# Altium PCB DB36.PcbDoc (part 5 of 6)
Units mm, origin at the board's own origin, x right, y up, seen from the top; angles counter-clockwise.
Board outline 82.2 x 113.2 mm, 8 copper layers (Top Layer, MidLayer1, MidLayer2, GND, MidLayer3, VCC, MidLayer4, Bottom Layer), stack 1.57 mm thick; 185 components, 477 nets, 1727 pads, 1538 vias.
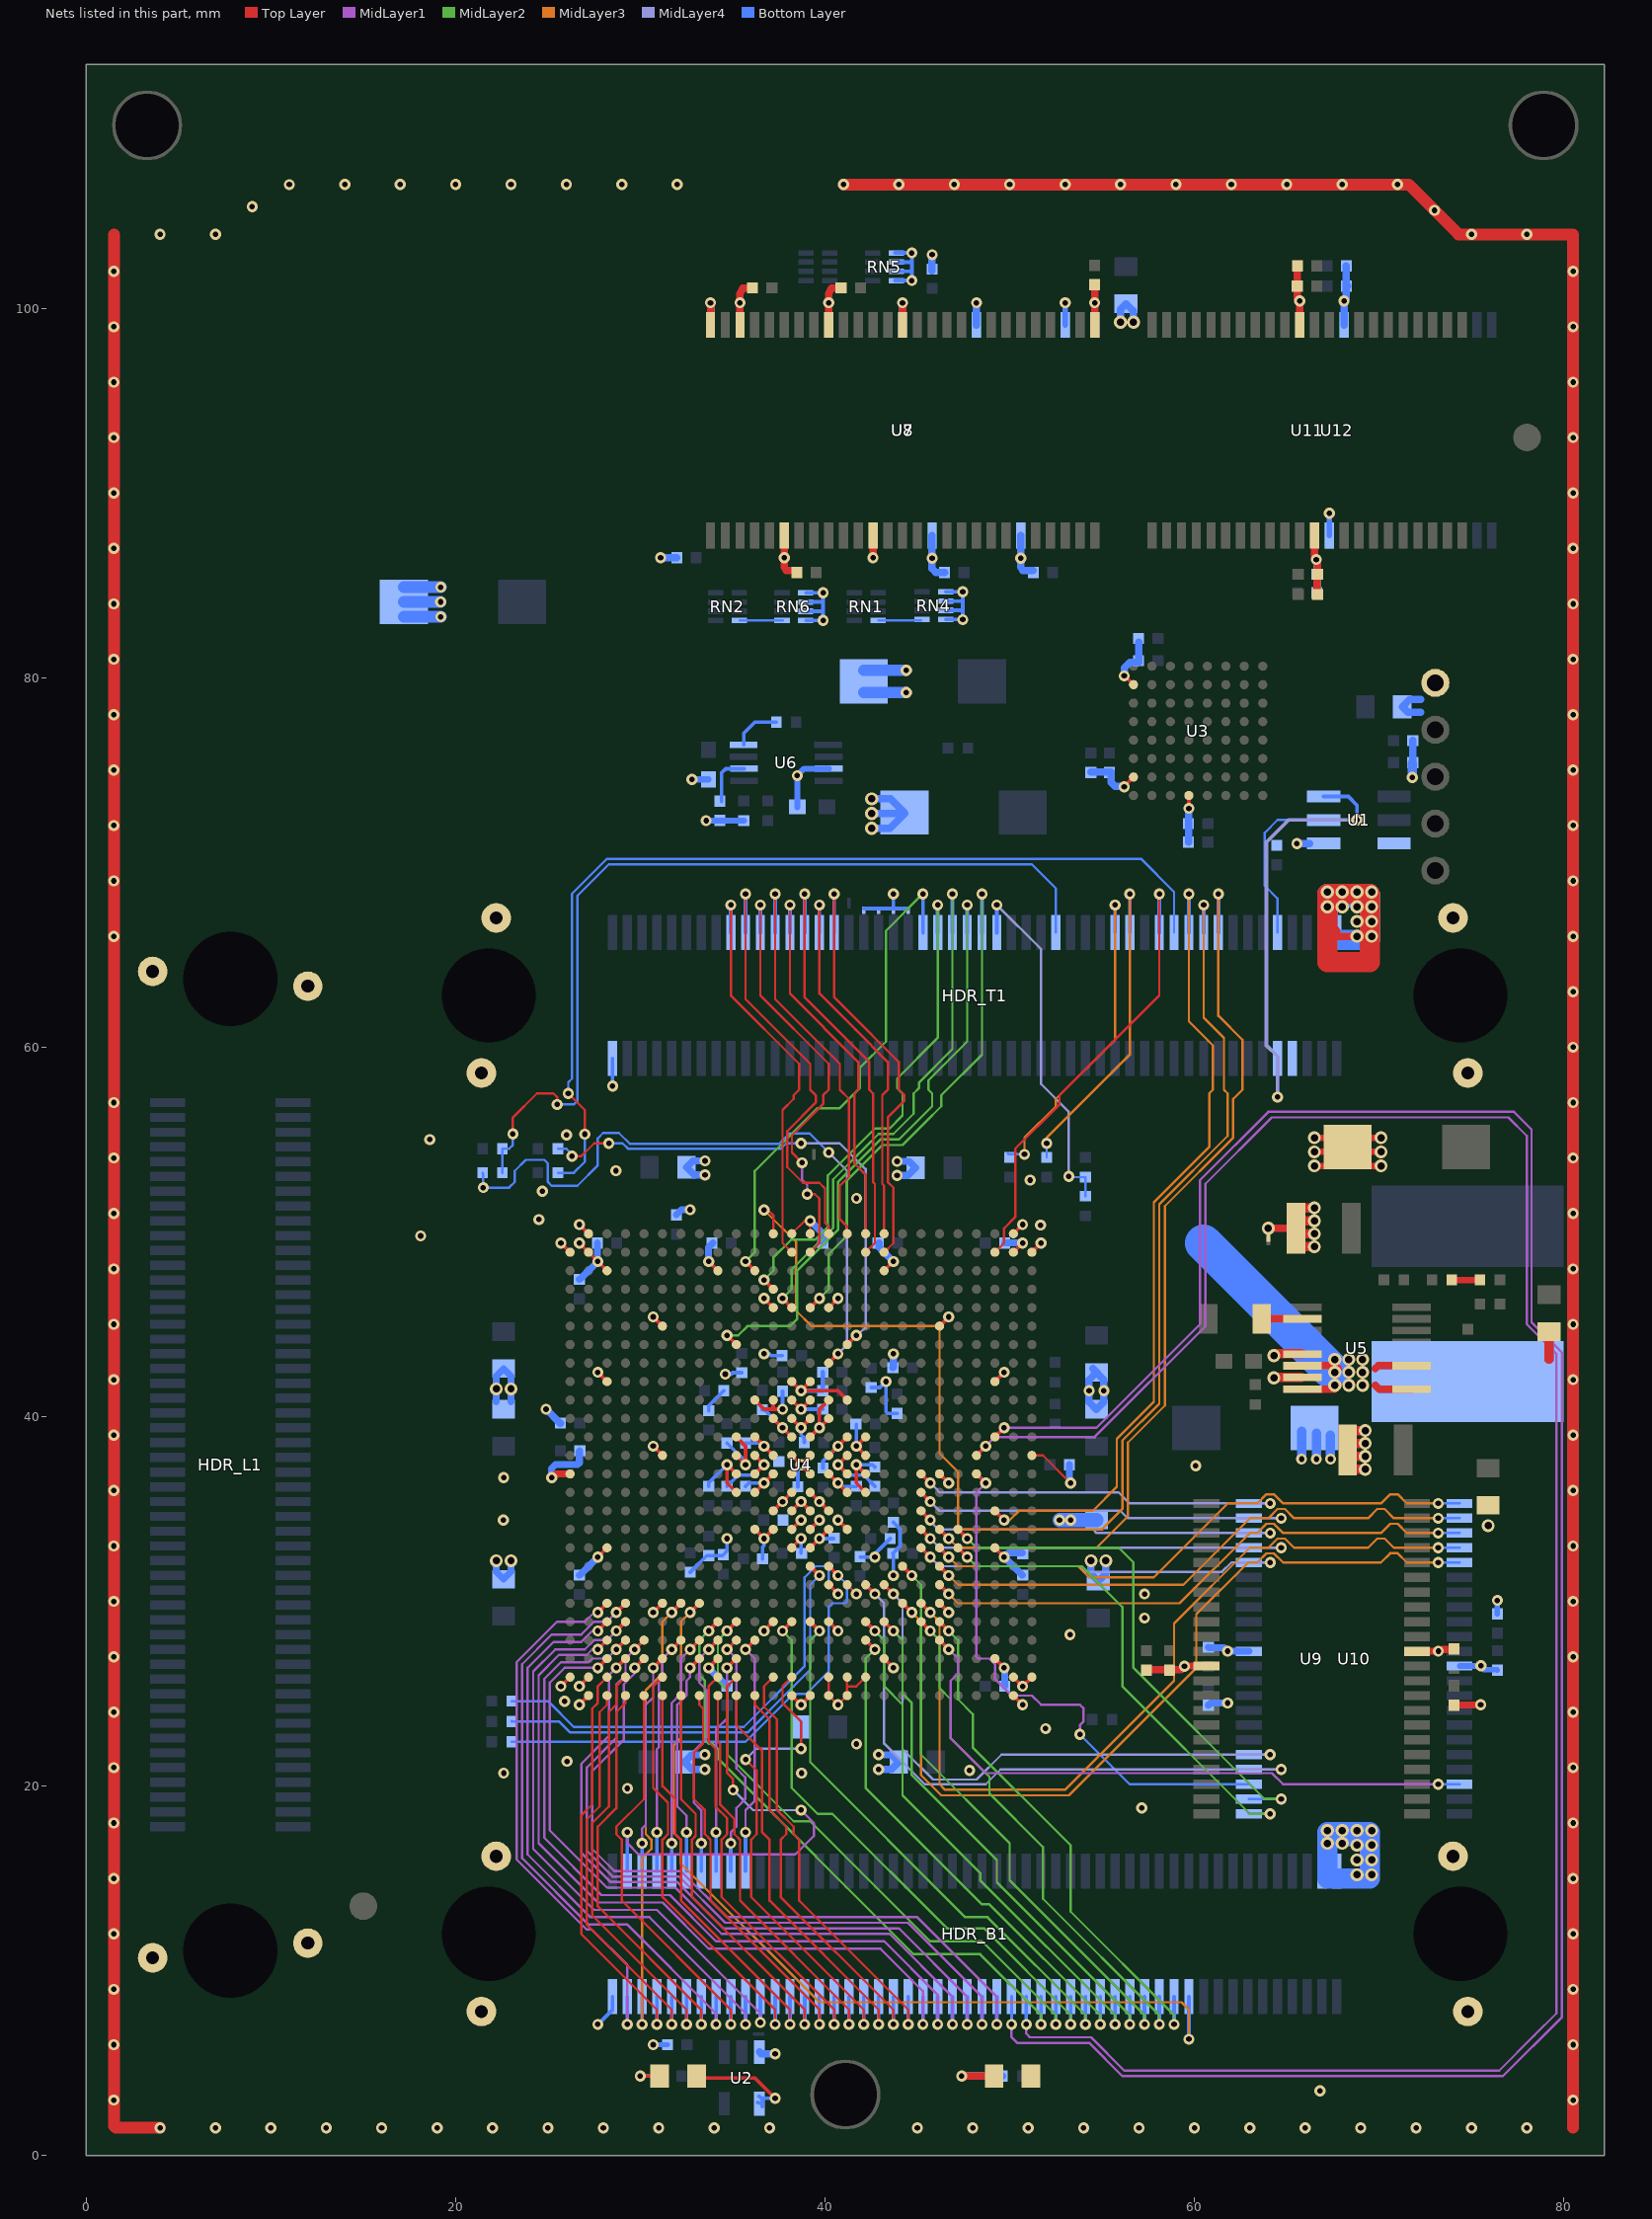
[diagram p11: the nets of this part, all layers, seen from the top]

## Via types
v1: diameter 0.6, hole 0.3, Top Layer to Bottom Layer, 904 vias
v2: diameter 0.6, hole 0.3, Top Layer to Bottom Layer, tented both sides, 506 vias
v3: diameter 0.7, hole 0.4, Top Layer to Bottom Layer, 127 vias
v4: diameter 0.6, hole 0.3, Top Layer to Bottom Layer, tented top, 1 vias

## Nets (pads, with @x,y where several pads share a name; then routed paths per layer and width w, separated by ;. In a path a pad name is that pad's centre, name@x,y a point inside that pad or via, vN(x,y) a via of type N, cw(c..) or ccw(c..) an arc to the next point about the centre after c; other vN are vias at no path point) (continued)
FPGA_PROGRAM: HDR_T1.62 R3.1 R15.1 | length 48.7
  Top Layer w0.127: v1(23.1,55.3) 23.1,56.2 24.4,57.5 25.3,57.5 25.5,57.3 v1(25.5,56.9)
  Bottom Layer w0.127: R15.1@22.538,53.2 R3.1@22.538,54.5 22.9,54.5 23.1,54.7 v1(23.1,55.3) ; v1(25.5,56.9) 26.4,56.9 26.6,57.1 26.6,68.2 28.3,69.9 51.2,69.9 52.5,68.6 HDR_T1.62@52.5,66.2
FPGA_TCK: HDR_T1.72 R7.1 | length 18.2
  MidLayer3 w0.127: v1(52,54.8) 52,55.1 52.3,55.4 ; 52.3,55.4 56.5,59.6 v2(56.5,68.3)
  Bottom Layer w0.127: R7.1@52,54.038 v1(52,54.8)
  Bottom Layer w0.2: HDR_T1.72@56.5,66.2 v2(56.5,68.3)
FPGA_TDI: HDR_T1.78 R10.1 | length 53
  Top Layer w0.127: v1(26.1,57.5) 27,56.6 v1(27,55.293)
  Bottom Layer w0.127: R10.1@25.538,53.2 26.4,53.2 27,53.8 v1(27,55.293) ; v1(26.1,57.5) 26.1,58.1 26.3,58.3 26.3,68.3 28.2,70.2 57.1,70.2 58.9,68.4 HDR_T1.78@58.9,66.2
FPGA_TDO: HDR_T1.54 R5.1 R8.1 | length 19.8
  MidLayer4 w0.127: v2(49.3,67.7) 51.7,65.3 51.7,58 53.2,56.5 v1(53.2,53)
  Bottom Layer w0.127: v1(53.2,53) 53.238,52.962 R5.1@54.1,52.962 R8.1@54.1,51.938
  Bottom Layer w0.2: HDR_T1.54@49.3,66.2 v2(49.3,67.7)
FPGA_TMS: HDR_T1.70 R6.1 | length 17.9
  MidLayer3 w0.127: v1(50.8,54.2) 50.8,55.1 52.5,56.8 52.5,57.2 55.7,60.4 v2(55.7,67.7)
  Bottom Layer w0.127: R6.1@49.9,54.238 49.938,54.2 50,54.2 v1(50.8,54.2)
  Bottom Layer w0.2: HDR_T1.70@55.7,66.2 v2(55.7,67.7)
GND: C1.1 C2.2 C3.2 C4.2 C5.2 C6.2 C7.2 C8.2 C9.2 C10.2 C11.2 C12.2 C13.2 C14.2 C15.2 C16.2 C17.2 C18.2 C19.2 C20.2 C21.2 C22.2 C23.2 C24.2 C25.2 C26.2 C27.2 C28.2 C29.2 C30.2 C31.2 C32.2 C33.2 C34.2 C35.2 C36.2 C37.2 C38.2 C39.2 C40.2 C41.2 C42.2 C43.2 C44.2 C45.2 C46.2 C47.2 C48.2 C49.2 C50.2 C51.2 C52.2 C53.2 C54.2 C55.2 C56.2 C57.2 C58.2 C59.2 C60.2 C61.2 C62.2 C63.2 C64.2 C65.2 C66.2 C67.2 C68.2 C69.2 C70.2 C71.1 C72.2 C73.2 C74.2 C75.2 C76.2 C77.2 C78.2 C79.2 C82.2 C83.2 C84.2 C85.2 C86.2 C88.2 C89.2 C90.2 C91.2 C92.2 C93.2 C94.2 C95.2 C96.2 C97.2 C98.2 C99.2 C100.2 C101.2 C102.2 C103.2 C104.2 C105.2 C106.2 C107.2 C108.2 C109.2 C110.2 C111.2 C112.2 C113.2 C114.2 HDR_B1.1 HDR_B1.98 HDR_B1.100 HDR_B1.MH1 HDR_B1.MH2 HDR_B1.MH3 HDR_B1.MH4 HDR_L1.MH1 HDR_L1.MH2 HDR_L1.MH3 HDR_L1.MH4 HDR_T1.1 HDR_T1.98 HDR_T1.100 HDR_T1.MH1 HDR_T1.MH2 HDR_T1.MH3 HDR_T1.MH4 LED2.2 NT3.2 NT5.2 NT6.2 NT7.2 NT8.2 R29.2 RN4.1 RN4.2 RN4.3 RN4.4 RN5.1 RN5.2 RN5.3 RN5.4 RN6.1 RN6.2 RN6.3 RN6.4 TP1.1 U1.1 U2.3 U3.E8 U3.H2 U3.H7 U4.A2 U4.A13 U4.A14 U4.A25 U4.AA6 U4.AA21 U4.AB12 U4.AB15 U4.AD9 U4.AD18 U4.AD24 U4.AE1 U4.AE2 U4.AE15 U4.AE16 U4.AE17 U4.AE25 U4.AE26 U4.AF2 U4.AF13 U4.AF14 U4.AF15 U4.AF16 U4.AF25 U4.B1 U4.B2 U4.B25 U4.B26 U4.C3 U4.C9 U4.C18 U4.E12 U4.E15 U4.F6 U4.F21 U4.J3 U4.J13 U4.J14 U4.J24 U4.K11 U4.K12 U4.K13 U4.K14 U4.K15 U4.K16 U4.L12 U4.L13 U4.L14 U4.L15 U4.M10 U4.M11 U4.M13 U4.M14 U4.M16 U4.M17 U4.N6 U4.N10 U4.N11 U4.N12 U4.N13 U4.N14 U4.N15 U4.N16 U4.N17 U4.N26 U4.P1 U4.P10 U4.P11 U4.P12 U4.P13 U4.P14 U4.P15 U4.P16 U4.P17 U4.P21 U4.R10 U4.R11 U4.R13 U4.R14 U4.R16 U4.R17 U4.T12 U4.T13 U4.T14 U4.T15 U4.U11 U4.U12 U4.U13 U4.U14 U4.U15 U4.U16 U4.V3 U4.V13 U4.V14 U4.V24 U4.Y16 U5.13 U5.15 U6.3 U7.6 U7.12 U7.28 U7.41 U7.46 U7.52 U7.54 U8.6 U8.12 U8.28 U8.41 U8.46 U8.52 U8.54 U9.12 U9.34 U10.12 U10.34 U11.12 U11.34 U12.12 U12.34 | length 594.7
  Top Layer w0.127: U4.A13@38.2,49.9 38.9,50.6 v1(39.2,50.6) U4.A14@39.2,49.9 ; U4.AE15@40.2,25.9 U4.AF15@40.2,24.9 v1(40.7,24.4) U4.AF16@41.2,24.9 ; U4.AF16@41.1,24.8 U4.AF16@41.2,24.9 ; 41.2,25.4 41.7,25.4 U4.AE17@42.2,25.9 ; U4.AE16@41.2,25.9 U4.AF16@41.2,24.9 ; U4.Y16@41.2,30.9 v2(41.7,30.4) ; U4.N26@51.2,37.9 51.8,37.9 v1(53.3,36.4)
  Top Layer w0.2: v1(25.7,25.4) U4.AE1@26.2,25.9 ; v1(25.7,49.4) U4.B1@26.2,48.9 ; v1(26.7,24.4) U4.AF2@27.2,24.9 ; v1(26.7,25.4) U4.AE2@27.2,25.9 ; v1(26.7,49.4) U4.C3@28.2,47.9 ; v1(26.7,50.4) U4.A2@27.2,49.9 ; v1(27.7,32.4) U4.V3@28.2,32.9 ; v1(27.7,42.4) U4.J3@28.2,41.9 ; v1(30.7,29.4) U4.AA6@31.2,29.9 ; v1(30.7,38.4) U4.N6@31.2,37.9 ; v1(30.7,45.4) U4.F6@31.2,44.9 ; v1(33.7,26.4) U4.AD9@34.2,26.9 ; v1(33.7,48.4) U4.C9@34.2,47.9 ; U4.R10@35.2,35.9 34.7,36.4 v1(34.7,37.4) U4.P10@35.2,36.9 ; U4.N10@35.2,37.9 v1(35.7,37.4) 35.7,38.4 U4.M10@35.2,38.9 ; U4.U11@36.2,33.9 v2(36.7,33.4) U4.U12@37.2,33.9 ; U4.R11@36.2,35.9 v1(36.7,36.4) U4.P12@37.2,36.9 ; U4.P11@36.2,36.9 v1(36.7,37.4) U4.N11@36.2,37.9 ; U4.M11@36.2,38.9 U4.N12@37.2,37.9 ; U4.K11@36.2,40.9 36.7,40.4 v2(37.7,40.4) ; v1(36.7,28.4) U4.AB12@37.2,28.9 ; v1(36.7,46.4) U4.E12@37.2,45.9 ; U4.T12@37.2,35 U4.T12@37.2,34.9 v1(37.7,35.4) U4.R13@38.2,35.9 ; U4.L12@37.2,39.9 U4.M13@38.2,38.9 ; 37.2,40.4 U4.K12@37.2,40.9 ; U4.AF13@38.2,24.9 v1(38.7,24.4) U4.AF14@39.2,24.9 ; U4.V13@38.2,32.9 v1(38.7,33.4) ; U4.U13@38.2,33.9 v1(38.7,34.4) ; U4.T13@38.2,34.9 v1(38.7,35.4) U4.T14@39.2,34.9 ; U4.L13@38.2,39.9 v1(38.7,39.4) U4.L14@39.2,39.9 ; U4.K13@38.2,40.9 v1(38.7,40.4) U4.K14@39.2,40.9 ; U4.J13@38.2,41.9 v1(38.7,41.4) ; U4.V14@39.2,32.9 v2(39.7,33.4) U4.U15@40.2,33.9 ; U4.U14@39.2,33.9 v2(39.7,34.4) ; U4.R14@39.2,35.9 v1(39.7,35.4) U4.T15@40.2,34.9 ; U4.M14@39.2,38.9 U4.L15@40.2,39.9 ; U4.J14@39.2,41.9 v1(38.7,41.4) ; v1(39.7,39.4) 39.7,40.4 U4.K15@40.2,40.9 ; U4.AB15@40.2,28.9 v1(40.7,28.4) ; U4.P15@40.2,36.9 v1(40.7,36.4) U4.R16@41.2,35.9 ; U4.N15@40.2,37.9 U4.M16@41.2,38.9 ; U4.E15@40.2,45.9 v1(40.7,46.4) ; v2(40.7,34.4) U4.U16@41.2,33.9 ; U4.P16@41.2,36.9 v1(40.7,37.4) U4.N16@41.2,37.9 ; U4.K16@41.2,40.9 40.7,41.4 v1(38.7,41.4) ; U4.R17@42.2,35.9 41.7,36.4 v1(41.7,37.4) U4.P17@42.2,36.9 ; U4.N17@42.2,37.9 v1(41.7,38.4) U4.M17@42.2,38.9 ; U4.AD18@43.2,26.9 v1(43.7,26.4) ; U4.C18@43.2,47.9 v1(43.7,48.4) ; U4.AA21@46.2,29.9 v1(46.7,29.4) ; U4.P21@46.2,36.9 v1(46.7,36.4) ; U4.F21@46.2,44.9 v1(46.7,45.4) ; U4.AD24@49.2,26.9 v1(49.7,26.4) ; U4.V24@49.2,32.9 v1(49.7,32.4) ; U4.J24@49.2,41.9 v1(49.7,42.4) ; U4.AF25@50.2,24.9 v1(50.7,24.4) ; U4.AE25@50.2,25.9 v1(50.7,25.4) U4.AE26@51.2,25.9 ; U4.B25@50.2,48.9 v1(50.7,49.4) ; U4.A25@50.2,49.9 v1(50.7,50.4) ; U4.B26@51.2,48.9 v1(51.7,49.4) ; v1@56.2,74.125 U3.H7@56.7,74.625 ; v1@56.2,80.125 56.213,80.113 U3.H2@56.7,79.625 ; v1(59.7,72.925) U3.E8@59.7,73.625
  Top Layer w0.203: U4.P13@38.2,36.9 U4.N14@39.2,37.9 ; U4.N13@38.2,37.9 U4.P14@39.2,36.9
  Top Layer w0.35: v3(66.5,53.576) C82.2@67.795,53.576 ; v3(66.5,54.338) C82.2@67.795,54.338 ; v3(66.5,55.1) C82.2@67.795,55.1 ; C82.2@68.809,53.576 v3(70.104,53.576) ; C82.2@68.809,54.338 v3(70.104,54.338) ; C82.2@68.809,55.1 v3(70.104,55.1)
  Top Layer w0.381: v1(25.2,36.7) 25.4,36.9 U4.P1@26.2,36.9 ; C102.2@57.4,26.275 57.425,26.3 59.3,26.3 59.461,26.461 v1(59.461,26.492) 59.469,26.5 U9.34@60.652,26.5 ; v3(64.3,42.1) v3@64.319,42.119 ; v3(64.3,43.3) v3@64.4,43.4 ; U9.12@72.052,27.3 73.198,27.3 v1(73.203,27.305) 73.305,27.305 73.4,27.4 74.027,27.4 C99.2@74.052,27.425 ; C101.2@74.049,24.331 74.1,24.327 74.027,24.4 v1(75.5,24.4)
  Top Layer w0.4: U7.54@33.8,99.1 v2(33.8,100.3) ; U7.52@35.4,99.1 v2(35.4,100.3) ; v2@35.4,100.2 35.4,100.7 ; 35.4,100.8 35.55,101.1 C95.2@36.075,101.1 ; C95.2@35.975,101.1 C95.2@36.025,101.05 ; U7.6@37.8,87.7 37.8,86.6 v2(37.8,86.5) 37.8,86 37.9,85.8 C92.2@38.475,85.8 ; U7.46@40.2,99.1 v2(40.2,100.3) ; v2@40.2,100.2 40.2,100.8 40.35,101.1 C96.2@40.875,101.1 ; v2(42.6,86.5) U7.12@42.6,87.7 ; U7.41@44.2,99.1 v2(44.2,100.3) ; U7.28@54.6,99.1 C91.2@54.6,101.275 ; v3(64,50.2) C86.2@65.6,50.2 ; C108.2@65.543,102.325 C108.2@65.546,102.328 ; C108.2@65.575,102.3 65.575,100.525 v2(65.7,100.4) U11.34@65.7,99.1 ; U11.12@66.5,87.7 66.5,86.5 v2(66.6,86.4) 66.668,86.332 C111.2@66.668,85.6 C111.2@66.693,85.625 ; C107.2@66.643,84.575 66.643,85.6 C111.2@66.644,85.604 ; 67.2,66 v3(68.8,66)
  Top Layer w0.5: 79.2,43.099 C85.2@79.2,44.6
  Top Layer w0.508: v3@64.319,42.119 U5.15@65.813,42.119 ; v3@64.4,43.4 U5.13@65.8,43.4 ; C86.2@65.5,49.2 v3(66.5,49.2) ; C86.2@65.5,49.9 v3(66.5,49.9) ; C86.2@65.5,50.6 v3(66.5,50.6) ; C86.2@65.5,51.3 v3(66.5,51.3) ; C84.2@68.25,37.15 v3(69.25,37.15) ; C84.2@68.25,37.85 v3(69.25,37.85) ; C84.2@68.25,38.55 v3(69.25,38.55) ; C84.2@68.25,39.25 v3(69.25,39.25)
  Top Layer w0.635: 1.5,104 1.5,1.6 1.6,1.5 v1(4,1.5) ; v1(41,106.7) 71.6,106.7 74.3,104 80.5,104 80.5,1.5
  Top Layer w1: 67.2,66.2 67.4,66.2
  Top Layer w1.1: 67.2,64.6 69.5,64.6 69.5,68.3 67.2,68.3 67.2,64.6
  Bottom Layer w0.2: v1@27.5,48.4 v1(27.7,48.4) v1@27.7,48.6 ; v2(27.7,7.1) 28.5,7.9 HDR_B1.1@28.5,8.6 ; v2(28.5,57.9) HDR_T1.1@28.5,59.4 ; C40.2@32.7,31.575 33.6,32.475 34.45,32.475 34.7,32.725 v2(34.7,33.4) ; C66.2@33.7,36.225 33.7,36.4 v1(34.7,37.4) ; C29.2@33.7,40.325 33.7,40.575 C53.2@34.525,41.4 ; C19.2@34.7,36.225 35.305,36.83 36.13,36.83 v1(36.7,37.4) ; C22.2@34.7,38.575 35.7,37.575 v1(35.7,37.4) ; C20.2@35.7,36.225 35.875,36.4 v1(36.7,36.4) ; C14.2@35.7,38.575 36.525,38.575 v1(36.7,38.4) ; C18.2@36.6,40.375 36.725,40.375 v1(37.7,39.4) ; C31.2@36.625,32.3 36.625,32.942 36.7,33.017 v2(36.7,33.4) ; C9.2@38.525,36.2 38.525,37.225 v1(38.7,37.4) ; C67.2@38.7,32.625 v1(38.7,33.4) ; v1(38.7,39.4) 38.7,39.024 38.875,38.849 C10.2@38.875,38.6 ; v1(38.7,40.4) C21.2@39.875,40.4 ; RN6.4@38.98,83.1 v1(39.9,83.1) v1(39.9,84.6) RN6.1@38.98,84.6 ; RN6.3@38.98,83.6 39.9,83.6 ; RN6.2@38.98,84.1 39.9,84.1 ; v2(39.7,33.4) C27.2@40.475,33.4 ; C15.2@39.9,37.225 39.9,37.6 v1(40.7,38.4) ; v1(40.7,36.4) 40.875,36.225 C8.2@41.7,36.225 ; v1(40.7,37.4) 40.705,37.4 41.275,36.83 42.095,36.83 C16.2@42.7,36.225 ; v1(41.7,37.4) 42.575,37.4 C26.2@42.7,37.275 ; v1(41.7,38.4) C17.2@41.7,39.575 ; C58.2@41.925,32.4 v1(42.7,32.4) 42.7,32.575 C7.2@43.525,33.4 ; NT7.2@42.1,67.5 NT3.2@44.5,67.5 ; C50.2@42.5,41.575 42.975,41.575 v1(43.3,41.9) 43.3,40.266 43.391,40.175 C52.2@43.9,40.175 ; C65.2@43.675,32.6 44.069,32.994 44.069,33.906 C30.2@43.7,34.275 ; NT5.2@43.7,67.5 v2(43.7,68.3) ; v2(43.7,31.4) C65.2@43.7,32.575 ; RN5.4@43.78,101.5 v1(44.7,101.5) v1(44.7,103) RN5.1@43.78,103 ; RN5.3@43.78,102 44.7,102 ; RN5.2@43.78,102.5 44.7,102.5 ; RN4.4@46.54,83.15 v1(47.46,83.15) v1(47.46,84.65) RN4.1@46.54,84.65 ; RN4.3@46.54,83.65 47.46,83.65 ; RN4.2@46.54,84.15 47.46,84.15
  Bottom Layer w0.203: v2(34.6,42.3) 34.934,42.3 35.009,42.375 C63.2@35.5,42.375 ; v2(36.7,43.4) 36.991,43.4 37.091,43.3 C61.2@37.675,43.3 ; v2(37.7,40.4) C28.2@37.7,41.375
  Bottom Layer w0.25: v1(30.7,6) C71.1@31.475,6
  Bottom Layer w0.254: v1(38.7,41.4) C12.2@39.875,41.4 C25.2@39.875,42.4
  Bottom Layer w0.3: U8.52@53,99.1 v2(53,100.3) ; U8.54@54.6,99.1 v2(54.6,100.3) ; U12.12@67.3,87.7 v2(67.3,88.9) ; U10.34@74.352,26.5 v1@75.496,26.5 ; v1(75.514,26.518) v1@75.496,26.5 ; C106.2@76.4,26.275 76.375,26.3 75.675,26.3 75.496,26.479 v1@75.496,26.5 ; C104.2@76.4,29.325 v1(76.4,30.05)
  Bottom Layer w0.33: v2(32.8,74.5) C89.2@33.7,74.5 ; v2(33.562,72.262) R29.2@35.6,72.262 ; C88.2@38.5,73 v2(38.5,74.7) 38.875,75.075 U6.3@40.2,75.075
  Bottom Layer w0.381: v3(22.2,32.2) 22.2,31.6 C35.2@22.6,31.2 23,31.6 v3(23,32.2) ; C4.2@22.2,40.8 C33.2@22.2,42.2 ; v3(22.2,41.5) C33.2@22.2,42.2 ; C4.2@23,40.8 C33.2@23,42.2 ; v3(23,41.5) C33.2@23,42.2 ; v1(25.2,36.7) 25.2,37.2 25.4,37.4 26.6,37.4 26.7,37.5 26.7,38.125 C55.2@26.724,38.15 ; C57.2@26.699,31.425 26.725,31.425 v1(27.7,32.4) ; C44.2@26.699,47.425 26.725,47.425 v1(27.7,48.4) ; v1@27.674,48.425 C68.2@27.674,49.4 ; C54.2@31.95,50.925 32.224,51.2 v1(32.7,51.2) ; v2(33.5,20.9) 32.8,20.9 C39.2@32.4,21.3 32.8,21.7 v2(33.5,21.7) ; v1(33.503,53.086) 33.5,53.083 32.917,53.083 C32.2@32.5,53.5 32.848,53.848 v1(33.503,53.848) ; v1(33.7,26.4) 34.676,25.424 C49.2@34.7,25.424 ; v1(33.7,48.4) 33.7,49.176 C47.2@33.925,49.4 ; v1(39.2,50.6) 39.925,49.875 C51.2@39.925,49.4 ; v1(42.9,20.9) 43.6,20.9 C38.2@44,21.3 43.6,21.7 v1(42.9,21.7) ; C43.2@42.925,49.4 42.925,49.175 v1(43.7,48.4) ; C41.2@43.675,42.65 43.7,42.675 v1(43.7,43.4) ; v1@43.9,52.961 v1(43.906,53.061) 44.489,53.061 C34.2@44.903,53.474 44.555,53.823 v1(43.906,53.823) ; C45.2@49.725,25.399 v1@49.725,26.374 ; C48.2@49.725,49.4 v1@50.699,49.4 ; C62.2@50.701,31.425 50.675,31.425 v1(49.7,32.4) 49.925,32.625 C64.2@50.701,32.625 ; C60.2@53.226,37.4 53.226,36.474 v1(53.3,36.4) ; C103.2@60.752,24.375 60.877,24.5 v1(61.8,24.5) ; C105.2@60.752,27.525 60.777,27.5 61.6,27.5 61.795,27.305 v1(61.798,27.305) 61.803,27.3 U10.12@62.952,27.3 ; C33.2@22.2,42.2 C33.2@22.6,42.6 C33.2@23,42.2
  Bottom Layer w0.4: v1(24.9,40.4) 25.65,39.65 C42.2@25.675,39.65 ; v2(31.1,86.5) C93.2@31.975,86.5 ; U8.28@33.8,99.1 v2@33.8,100.2 ; U2.3@36.45,5.6 36.55,5.5 v1(37.3,5.5) ; v3(42.525,71.85) 43.52,71.85 44.327,72.657 44.289,72.694 43.534,73.45 v3(42.525,73.45) ; v3(42.525,72.65) C70.2@44.32,72.65 ; U8.41@44.2,99.1 v2(44.2,100.3) ; U8.12@45.8,87.7 45.8,86.5 v2(45.8,86.475) 45.8,85.9 46,85.7 C98.2@46.475,85.7 ; C94.2@45.8,102.025 45.8,102.8 v2(45.8,102.9) ; U8.46@48.2,99.1 v2(48.2,100.3) ; U8.6@50.6,87.7 50.6,86 50.7,85.8 C97.2@51.275,85.8 ; v3(54.4,32.2) 54.4,31.5 C37.2@54.8,31.1 54.9,31.2 55.2,31.5 v3(55.2,32.2) ; C77.2@54.4,74.9 55.5,74.9 55.5,74.325 55.7,74.125 v1@56.2,74.125 ; C36.2@54.5,42.6 55.1,42 55.1,40.8 C6.2@54.7,40.4 54.3,40.8 54.3,42 C36.2@54.7,42.4 ; v3(56,99.25) 56,99.95 C79.2@56.3,100.25 56.7,99.85 v3(56.7,99.25) ; v1(56.2,80.1) 56.2,80.525 56.5,80.825 56.975,80.825 C73.2@56.975,81.925 ; C72.2@59.675,71.1 59.7,71.125 v1(59.7,72.925) ; v2(65.55,71.025) 66.245,71.025 U1.1@66.25,71.03 ; v2(66.6,86.4) 66.625,86.375 C109.2@66.625,84.6 ; v2@68.1,100.5 v2(68.1,100.4) 68.225,100.525 C114.2@68.225,101.2 ; U12.34@68.107,99.1 v2@68.107,100.2 ; C110.2@68.225,102.3 68.225,101.275 C114.2@68.3,101.2 ; C2.2@71.825,75.4 C1.1@71.825,76.6 ; 72.25,78.125 71.55,78.125 C78.2@71.25,78.425 71.65,78.825 72.25,78.825
  Bottom Layer w0.508: v1(65.8,37.7) C3.2@65.8,39.2 ; v1(66.6,37.7) C3.2@66.6,39.1 ; v1(67.369,37.7) C3.2@67.369,39 ; v2(71.8,74.6) C2.2@71.8,75.375
  Bottom Layer w0.635: C69.2@17.2,83.3 v2(19.2,83.3) ; C69.2@17.2,84.9 v2(19.2,84.9) ; C69.2@17.202,84.107 v2(19.193,84.107) ; C23.2@42.1,79.2 v2(44.4,79.2) ; C23.2@42.1,80.4 v2(44.4,80.4)
  Bottom Layer w0.762: v1(52.7,34.4) C5.2@54.701,34.4
  Bottom Layer w1.1: v3@67.3,17.3 v3@69.5,17.3 ; v3@67.3,68.1 v3@69.5,68.1 ; v3@69.5,68.1 69.5,68.3 67.2,68.3 67.2,65.8 69.5,65.8 69.5,66 69.5,66.8 69.5,67.6 v3@69.5,68.1 ; 67.2,15 69.5,15 69.5,15.2 69.5,16 69.5,16.8 69.5,17.5 67.2,17.5 67.2,15
  other v1: 7,1.5 10,1.5 13,1.5 16,1.5 19,1.5 22,1.5 25,1.5 28,1.5 31,1.5 34,1.5 37,1.5 45,1.5 48,1.5 51,1.5 54,1.5 57,1.5 60,1.5 63,1.5 66,1.5 69,1.5 72,1.5 75,1.5 78,1.5 1.5,3 80.5,3 66.8,3.5 1.5,6 80.5,6 1.5,9 80.5,9 1.5,12 80.5,12 1.5,15 80.5,15 1.5,18 80.5,18 57.15,18.821 29.304,19.873 22.606,20.701 38.735,20.701 47.828,20.853 1.5,21 80.5,21 26.035,21.336 41.707,22.276 51.943,23.114 1.5,24 80.5,24 25.903,24.595 1.5,27 80.5,27 53.264,28.194 57.3,29.1 1.5,30 80.5,30 57.3,30.4 1.5,33 80.5,33 22.583,34.404 53.3,34.4 1.5,36 80.5,36 22.606,36.703 60.071,37.338 1.5,39 80.5,39 54.3,41.4 55.1,41.4 1.5,42 80.5,42 1.5,45 80.5,45 1.5,48 80.5,48 18.11,49.784 51.664,50.368 24.511,50.673 1.5,51 80.5,51 41.707,51.816 51.105,52.807 28.677,53.315 1.5,54 80.5,54 26.01,55.245 1.5,57 80.5,57 80.5,60 80.5,63 1.5,66 80.5,66 1.5,69 80.5,69 1.5,72 80.5,72 56.2,74.1 1.5,75 80.5,75 1.5,78 80.5,78 1.5,81 80.5,81 1.5,84 80.5,84 1.5,87 80.5,87 1.5,90 80.5,90 1.5,93 80.5,93 1.5,96 80.5,96 1.5,99 80.5,99 1.5,102 80.5,102 4,104 7,104 75,104 78,104 73,105.3 8.989,105.499 10.996,106.695 14,106.7 17,106.7 20,106.7 23,106.7 26,106.7 29,106.7 32,106.7 44,106.7 47,106.7 50,106.7 53,106.7 56,106.7 59,106.7 62,106.7 65,106.7 68,106.7 71,106.7
  other v2: 24.7,52.2 18.6,55 50.6,86.475
  other v3: 68.8,15.2 69.6,15.2 68.8,16 69.6,16 68.8,16.8 69.6,16.8 67.2,16.9 68,16.9 67.2,17.6 68,17.6 68.8,17.6 69.6,17.6 75.9,34.1 69.6,66 68.8,66.8 69.6,66.8 67.2,67.6 68,67.6 68.8,67.6 69.6,67.6 67.2,68.4 68,68.4 68.8,68.4 69.6,68.4
HSWAP_EN: R4.2 U4.G16 | length 27.9
  Top Layer w0.127: v1(26.3,54.1) 26.8,54.1 27.5,54.8 v1(28.3,54.8)
  Top Layer w0.2: U4.G16@41.2,43.9 v1(41.7,44.4)
  MidLayer4 w0.127: v1(38.7,54.8) 40.8,54.8 42.2,53.4 42.2,48.7 42.2,44.8 v1(41.7,44.4)
  Bottom Layer w0.127: R4.2@25.538,54.5 26,54.5 26.3,54.2 v1(26.3,54.1) ; v1(28.3,54.8) 29.04,54.8 29.329,54.511 37.61,54.511 37.899,54.8 v1(38.7,54.8)
IO0: HDR_B1.7 U4.AE3 | length 22.6
  Top Layer w0.127: U4.AE3@28.2,25.9 27.7,25.4 27.7,24.5 27.4,24.2 27.4,23.3 27.4,23 27.4,19 26.8,18.4 26.8,12 30.9,7.9 v2(30.9,7.1)
  Bottom Layer w0.2: v2(30.9,7.1) HDR_B1.7@30.9,8.6
IO1: HDR_B1.9 U4.AF3 | length 21.7
  Top Layer w0.127: U4.AF3@28.2,24.9 28.2,24.4 27.8,24 27.8,23.3 27.8,23 27.8,18.9 27.1,18.2 27.1,12.5 31.7,7.9 v2(31.7,7.1)
  Bottom Layer w0.2: v2(31.7,7.1) HDR_B1.9@31.7,8.6
IO2: HDR_B1.11 U4.AE4 | length 23.2
  Top Layer w0.127: U4.AE4@29.2,25.9 28.7,25.4 28.7,24.4 28.3,24 28.3,23.3 28.3,23 28.3,18.9 27.4,18 27.4,13 32.5,7.9 v2(32.5,7.1)
  Bottom Layer w0.2: v2(32.5,7.1) HDR_B1.11@32.5,8.6
IO3: HDR_B1.13 U4.AF4 | length 22.2
  Top Layer w0.127: U4.AF4@29.2,24.9 29.2,24.5 28.7,24 28.7,23.3 28.7,23 28.7,18.8 27.7,17.8 27.7,13.5 33.3,7.9 v2(33.3,7.1)
  Bottom Layer w0.2: v2(33.3,7.1) HDR_B1.13@33.3,8.6
IO4: HDR_B1.15 U4.AA4 | length 33.5
  Top Layer w0.2: v1(28.7,29.4) U4.AA4@29.2,29.9
  MidLayer1 w0.127: v1(28.7,29.4) 28.2,28.9 27.5,28.9 26.8,28.2 25.2,28.2 23.6,26.6 23.6,16.1 27.2,12.5 29.3,12.5 34.1,7.7 v2(34.1,7.1)
  Bottom Layer w0.2: v2(34.1,7.1) HDR_B1.15@34.1,8.6
IO5: HDR_B1.17 U4.AF5 | length 22.5
  Top Layer w0.127: U4.AF5@30.2,24.9 30.2,24.4 30.2,23.3 30.2,23 30.2,19.3 28.7,17.8 28.7,17.4 29,17.1 29,13.8 34.9,7.9 v2(34.9,7.1)
  Bottom Layer w0.2: v2(34.9,7.1) HDR_B1.17@34.9,8.6
IO6: HDR_B1.19 U4.AB3 | length 32.9
  Top Layer w0.2: v1(27.7,28.4) U4.AB3@28.2,28.9
  MidLayer1 w0.127: v1(27.7,28.4) 27.4,28.4 26.8,27.8 25.3,27.8 23.9,26.4 23.9,16.3 27.3,12.9 30.5,12.9 35.7,7.7 v2(35.7,7.1)
  Bottom Layer w0.2: v2(35.7,7.1) HDR_B1.19@35.7,8.6
IO7: HDR_B1.21 U4.AB4 | length 33.8
  Top Layer w0.2: v1(28.7,28.4) U4.AB4@29.2,28.9
  MidLayer1 w0.127: v1(28.7,28.4) 28.2,27.9 27.5,27.9 27,27.4 25.4,27.4 24.2,26.2 24.2,16.6 27.5,13.3 30.9,13.3 36.5,7.7 v2@36.5,7.1
  Bottom Layer w0.2: v2@36.5,7.1 HDR_B1.21@36.5,8.6
  other v2: 36.5,7.2
IO8: HDR_B1.23 U4.AE6 | length 23.5
  Top Layer w0.127: U4.AE6@31.2,25.9 30.7,25.4 30.7,25.3 30.7,23.3 30.7,23 30.7,19.9 31.5,19.1 31.5,17.4 31.2,17.1 31.2,14 37.3,7.9 v2(37.3,7.1)
  Bottom Layer w0.2: v2(37.3,7.1) HDR_B1.23@37.3,8.6
IO9: HDR_B1.25 U4.AF6 | length 22.2
  Top Layer w0.127: U4.AF6@31.2,24.9 31.2,23.3 31.2,23 31.2,20 31.9,19.3 31.9,17.4 32.2,17.1 32.2,13.8 38.1,7.9 v2(38.1,7.1)
  Bottom Layer w0.2: v2(38.1,7.1) HDR_B1.25@38.1,8.6
IO10: HDR_B1.27 U4.AF7 | length 22.2
  Top Layer w0.127: U4.AF7@32.2,24.9 32.2,23.3 32.2,23 32.2,19.3 33,18.5 33,17.3 32.8,17.1 32.8,14 38.9,7.9 v2(38.9,7.1)
  Bottom Layer w0.2: v2(38.9,7.1) HDR_B1.27@38.9,8.6
IO11: HDR_B1.29 U4.AF8 | length 22.4
  Top Layer w0.127: U4.AF8@33.2,24.9 33.2,24.4 33.4,24.2 33.4,23.3 33.4,23 33.4,22.3 32.9,21.8 32.9,19.3 33.5,18.7 33.5,17.4 33.8,17.1 33.8,13.8 39.7,7.9 v2(39.7,7.1)
  Bottom Layer w0.2: v2(39.7,7.1) HDR_B1.29@39.7,8.6
IO12: HDR_B1.31 U4.AE9 | length 23.6
  Top Layer w0.127: U4.AE9@34.2,25.9 33.7,25.4 33.7,23.3 33.7,23 33.7,22.4 34.072,22.028 34.072,18.883 34.7,18.255 34.7,17.4 34.4,17.1 34.4,14 40.5,7.9 v2(40.5,7.1)
  Bottom Layer w0.2: v2(40.5,7.1) HDR_B1.31@40.5,8.6
IO13: HDR_B1.33 U4.AF9 | length 22.2
  Top Layer w0.127: U4.AF9@34.2,24.9 34.2,23.3 34.2,23 34.2,22.4 34.326,22.274 34.326,18.989 35.1,18.214 35.1,17.4 35.4,17.1 35.4,13.8 41.3,7.9 v2(41.3,7.1)
  Bottom Layer w0.2: v2(41.3,7.1) HDR_B1.33@41.3,8.6
IO14: HDR_B1.35 U4.AE13 | length 26.5
  Top Layer w0.127: v1(35.702,21.438) 36.3,20.84 36.3,17.4 36,17.1 36,14 42.1,7.9 v2(42.1,7.1) ; U4.AE13@38.2,25.9 37.7,25.4 37.7,24.5 38.699,23.5 v1(38.699,22.022)
  MidLayer4 w0.127: v1(35.702,21.438) 36.292,22.027 v1(38.699,22.022)
  Bottom Layer w0.2: v2(42.1,7.1) HDR_B1.35@42.1,8.6
IO15: HDR_B1.37 U4.AF10 | length 22.5
  Top Layer w0.127: U4.AF10@35.2,24.9 35.2,23.3 36.6,21.9 36.6,17.5 37,17.1 37,13.8 42.9,7.9 v2(42.9,7.1)
  Bottom Layer w0.2: v2(42.9,7.1) HDR_B1.37@42.9,8.6
IO16: HDR_B1.39 U4.AF11 | length 22.7
  Top Layer w0.127: U4.AF11@36.2,24.9 36.2,24.4 37,23.6 37,22.9 37,22.6 37,18.7 37.9,17.8 37.9,17.4 37.6,17.1 37.6,14 43.7,7.9 v2(43.7,7.1)
  Bottom Layer w0.2: v2(43.7,7.1) HDR_B1.39@43.7,8.6
IO17: HDR_B1.41 U4.AE12 | length 23.7
  Top Layer w0.127: U4.AE12@37.2,25.9 36.7,25.4 36.7,24.3 37.4,23.6 37.4,22.9 37.4,22.6 37.4,18.7 38.3,17.8 38.3,17.4 38.6,17.1 38.6,13.8 44.5,7.9 v2(44.5,7.1)
  Bottom Layer w0.2: v2(44.5,7.1) HDR_B1.41@44.5,8.6
IO18: HDR_B1.43 U4.AC3 | length 41
  Top Layer w0.2: v1(27.7,27.4) U4.AC3@28.2,27.9
  MidLayer1 w0.127: v1(27.7,27.4) 27.4,27.4 27.1,27.1 25.6,27.1 24.5,26 24.5,16.9 27.7,13.7 31.2,13.7 33.7,11.2 43,11.2 45.3,8.9 v2(45.3,7.1)
  Bottom Layer w0.2: v2(45.3,7.1) HDR_B1.43@45.3,8.6
IO19: HDR_B1.45 U4.AC4 | length 41.8
  Top Layer w0.2: v1(28.7,27.4) U4.AC4@29.2,27.9
  MidLayer1 w0.127: v1(28.7,27.4) 28.2,26.9 27.4,26.9 27.2,26.7 25.7,26.7 24.8,25.8 24.8,17.2 27.9,14.1 31.6,14.1 34.1,11.6 43.2,11.6 46.1,8.7 v2(46.1,7.1)
  Bottom Layer w0.2: v2(46.1,7.1) HDR_B1.45@46.1,8.6
IO20: HDR_B1.47 U4.AD3 | length 40.6
  Top Layer w0.2: v1(27.7,26.4) U4.AD3@28.2,26.9
  MidLayer1 w0.127: v1(27.7,26.4) 25.9,26.4 25.1,25.6 25.1,17.6 28.2,14.5 31.9,14.5 34.4,12 43.5,12 46.9,8.6 v2(46.9,7.1)
  Bottom Layer w0.2: v1@27.5,26.4 v1(27.7,26.4) v1@27.7,26.2 ; v2(46.9,7.1) HDR_B1.47@46.9,8.6
IO21: HDR_B1.49 U4.AD4 | length 38.6
  Top Layer w0.2: v1(28.7,26.4) U4.AD4@29.2,26.9
  MidLayer1 w0.127: v1(28.7,26.4) 28.3,26 28.3,23.3 28.3,23 28.3,22.7 26.8,21.2 26.8,16.4 28.4,14.8 32,14.8 34.5,12.3 44,12.3 47.7,8.6 v2(47.7,7.1)
  Bottom Layer w0.2: v2(47.7,7.1) HDR_B1.49@47.7,8.6
IO22: HDR_B1.51 U4.AC5 | length 40.4
  Top Layer w0.2: v1(29.7,27.4) U4.AC5@30.2,27.9
  MidLayer1 w0.127: v1(29.7,27.4) 29.2,26.9 29.2,26 28.7,25.5 28.7,23.3 28.7,23 28.7,22.6 27.1,21 27.1,16.5 28.5,15.1 32.1,15.1 34.6,12.6 44.5,12.6 48.5,8.6 v2(48.5,7.1)
  Bottom Layer w0.2: v2(48.5,7.1) HDR_B1.51@48.5,8.6
IO23: HDR_B1.53 U4.AD5 | length 39.7
  Top Layer w0.2: v1(29.7,26.4) U4.AD5@30.2,26.9
  MidLayer1 w0.127: v1(29.7,26.4) 29.7,26.1 29.1,25.5 29.1,23.3 29.1,23 29.1,22.5 27.4,20.8 27.4,16.6 28.6,15.4 32.2,15.4 34.7,12.9 45,12.9 49.3,8.6 v2(49.3,7.1)
  Bottom Layer w0.2: v2(49.3,7.1) HDR_B1.53@49.3,8.6
IO24: HDR_B1.55 U4.M24 | length 124.2
  Top Layer w0.2: U4.M24@49.2,38.9 v1(49.7,39.4)
  MidLayer1 w0.127: v1(49.7,39.4) 52.8,39.4 53.1,39.4 54.7,39.4 60.3,45 60.3,52.8 64,56.5 77.3,56.5 78.254,55.546 78.254,45.105 79.9,43.459 79.9,7.5 76.7,4.3 56.1,4.3 54.3,6.1 50.4,6.1 50.1,6.4 v2(50.1,7.1)
  Bottom Layer w0.178: v2(50.1,7.1) HDR_B1.55@50.1,8.6
IO25: HDR_B1.57 U4.N23 | length 123.3
  Top Layer w0.2: U4.N23@48.2,37.9 v1(48.7,38.4)
  MidLayer1 w0.127: v1(48.7,38.4) 49.2,38.9 52.8,38.9 53.1,38.9 54.6,38.9 60.6,44.9 60.6,52.6 64.2,56.2 77,56.2 78,55.2 78,45 79.6,43.4 79.6,7.7 78.4,6.5 76.5,4.6 56.2,4.6 54.4,6.4 51.1,6.4 50.9,6.6 v2(50.9,7.1)
  Bottom Layer w0.178: v2(50.9,7.1) HDR_B1.57@50.9,8.6
IO26: HDR_B1.59 U4.AB9 | length 33.6
  Top Layer w0.2: v1(33.7,28.4) U4.AB9@34.2,28.9
  MidLayer2 w0.127: v1(33.7,28.4) 33.2,27.9 33.2,26 33.5,25.7 33.5,23.3 33.5,23 33.5,22.5 33.7,22.3 33.9,22.3 34.25,21.95 34.25,21.45 44.8,10.9 48.4,10.9 51.7,7.6 v2(51.7,7.1)
  Bottom Layer w0.2: v2(51.7,7.1) HDR_B1.59@51.7,8.6
IO27: HDR_B1.61 U4.AB10 | length 33.5
  Top Layer w0.2: v1(34.7,28.4) U4.AB10@35.2,28.9
  MidLayer2 w0.127: v1(34.7,28.4) 34.2,27.9 34.2,25.7 34.7,25.2 34.7,23.3 34.7,23 34.7,21.7 38.3,18.1 39.2,18.1 45.7,11.6 48.5,11.6 52.5,7.6 v2(52.5,7.1)
  Bottom Layer w0.2: v2(52.5,7.1) HDR_B1.61@52.5,8.6
IO28: HDR_B1.63 U4.AB13 | length 31.6
  Top Layer w0.2: v1(37.7,28.4) U4.AB13@38.2,28.9
  MidLayer2 w0.127: v1(37.7,28.4) 38.2,27.9 38.2,19.9 39.6,18.5 40.4,18.5 46.6,12.3 48.6,12.3 53.3,7.6 v2(53.3,7.1)
  Bottom Layer w0.2: v2(53.3,7.1) HDR_B1.63@53.3,8.6
IO29: HDR_B1.65 U4.AB14 | length 30.6
  Top Layer w0.2: U4.AB14@39.2,28.9 v1(39.7,28.4)
  MidLayer2 w0.127: v1(39.7,28.4) 39.2,27.9 39.2,23.3 39.2,23 39.2,21.3 47.6,12.9 48.8,12.9 54.1,7.6 v2(54.1,7.1)
  Bottom Layer w0.2: v2(54.1,7.1) HDR_B1.65@54.1,8.6
IO30: HDR_B1.67 U4.AC17 | length 28.2
  Top Layer w0.2: U4.AC17@42.2,27.9 v1(42.7,27.4)
  MidLayer2 w0.127: v1(42.7,27.4) 42.2,26.9 42.2,23.3 42.2,23 42.2,19.9 48.5,13.6 48.9,13.6 54.9,7.6 v2(54.9,7.1)
  Bottom Layer w0.2: v2(54.9,7.1) HDR_B1.67@54.9,8.6
IO31: HDR_B1.69 U4.AB17 | length 28.9
  Top Layer w0.2: U4.AB17@42.2,28.9 v1(42.7,28.4)
  MidLayer2 w0.127: v1(42.7,28.4) 43.2,27.9 43.2,25.4 44.2,24.4 44.2,23.3 44.2,23 44.2,19.5 48.4,15.3 48.4,14.9 55.7,7.6 v2(55.7,7.1)
  Bottom Layer w0.2: v2(55.7,7.1) HDR_B1.69@55.7,8.6
IO32: HDR_B1.71 U4.AB18 | length 28.8
  Top Layer w0.2: U4.AB18@43.2,28.9 v1(43.7,28.4)
  MidLayer2 w0.127: v1(43.7,28.4) 44.2,27.9 44.2,25 44.7,24.5 44.7,23.3 44.7,23 44.7,20.6 49.3,16 49.3,14.8 56.5,7.6 v2(56.5,7.1)
  Bottom Layer w0.2: v2(56.5,7.1) HDR_B1.71@56.5,8.6
IO33: HDR_B1.73 U4.W19 | length 31.7
  Top Layer w0.2: U4.W19@44.2,31.9 v1(44.7,31.4)
  MidLayer2 w0.127: v1(44.7,31.4) 45.2,30.9 45.2,23.3 45.2,23 45.2,21.7 50,16.9 50,14.9 57.3,7.6 v2(57.3,7.1)
  Bottom Layer w0.2: v2(57.3,7.1) HDR_B1.73@57.3,8.6
IO34: HDR_B1.75 U4.AB20 | length 28.6
  Top Layer w0.2: U4.AB20@45.2,28.9 v1(45.7,28.4)
  MidLayer2 w0.127: v1(45.7,28.4) 46.2,27.9 46.2,25.3 46.8,24.7 46.8,23.3 46.8,23 46.8,22.6 48.9,20.5 48.9,19.6 51.8,16.7 51.8,13.9 58.1,7.6 v2(58.1,7.1)
  Bottom Layer w0.2: v2(58.1,7.1) HDR_B1.75@58.1,8.6
IO35: HDR_B1.77 U4.AB21 | length 28.6
  Top Layer w0.2: U4.AB21@46.2,28.9 v1(46.7,28.4)
  MidLayer2 w0.127: v1(46.7,28.4) 47.2,27.9 47.2,24.7 48,23.9 48,23.3 48,23 48,22.1 53.3,16.8 53.3,13.2 58.9,7.6 v2(58.9,7.1)
  Bottom Layer w0.2: v2(58.9,7.1) HDR_B1.77@58.9,8.6
KBCLOCK: HDR_T1.26 U4.A17 | length 21.2
  Top Layer w0.127: v2(38.1,67.7) 38.1,62.9 41.8,59.2 41.8,57.7 41.6,57.5 41.6,53.7 42.2,53.1 42.2,51.8 42.2,51.5 U4.A17@42.2,49.9
  Bottom Layer w0.2: HDR_T1.26@38.1,66.2 v2(38.1,67.7)
KBDATA: HDR_T1.28 U4.B17 | length 23.3
  Top Layer w0.127: v2(38.9,68.3) 38.9,63.9 38.9,62.7 42.4,59.2 42.4,57.7 42.6,57.5 42.6,52.7 42.7,52.6 42.7,51.8 42.7,51.5 42.7,49.4 U4.B17@42.2,48.9
  Bottom Layer w0.2: HDR_T1.28@38.9,66.2 v2(38.9,68.3)
LED0: HDR_B1.6 U4.AD6 | length 12
  Top Layer w0.2: v1(30.7,26.4) U4.AD6@31.2,26.9
  MidLayer1 w0.127: v2(30.1,16.9) 30.1,17.7 30.3,17.9 30.3,23 30.3,23.3 30.3,24.4 30.7,24.8 v1(30.7,26.4)
  Bottom Layer w0.2: HDR_B1.6@30.1,15.4 v2(30.1,16.9)
LED1: HDR_B1.8 U4.AC7 | length 13
  Top Layer w0.2: v1(31.7,27.4) U4.AC7@32.2,27.9
  MidLayer1 w0.127: v2(30.9,17.5) 30.9,22 31,22.1 31,23 31,23.3 31,25.8 31.2,26 31.2,26.9 v1(31.7,27.4)
  Bottom Layer w0.2: HDR_B1.8@30.9,15.4 v2(30.9,17.5)
LED2: HDR_B1.10 U4.AC8 | length 13.1
  Top Layer w0.2: v1(32.7,27.4) U4.AC8@33.2,27.9
  MidLayer1 w0.127: v2(31.7,16.9) 31.7,23 31.7,23.3 31.7,24.5 32.2,25 32.2,26.9 v1(32.7,27.4)
  Bottom Layer w0.2: HDR_B1.10@31.7,15.4 v2(31.7,16.9)
LED3: HDR_B1.12 U4.AD8 | length 12.2
  Top Layer w0.2: v1(32.7,26.4) U4.AD8@33.2,26.9
  MidLayer1 w0.127: v2(32.5,17.5) 32.5,18.4 32,18.9 32,23 32,23.3 32,24.4 32.5,24.9 32.5,25.7 32.7,25.9 v1(32.7,26.4)
  Bottom Layer w0.2: HDR_B1.12@32.5,15.4 v2(32.5,17.5)
LED4: HDR_B1.14 U4.AC9 | length 13.5
  Top Layer w0.2: v1(33.7,27.4) U4.AC9@34.2,27.9
  MidLayer1 w0.127: v2(33.3,16.9) 33.3,18.7 32.9,19.1 32.9,21.9 33.6,22.6 33.6,23 33.6,23.3 33.6,25.2 33.2,25.6 33.2,26.9 v1(33.7,27.4)
  Bottom Layer w0.2: HDR_B1.14@33.3,15.4 v2(33.3,16.9)
LED5: HDR_B1.16 U4.AD10 | length 12
  Top Layer w0.2: v1(34.7,26.4) U4.AD10@35.2,26.9
  MidLayer1 w0.127: v2(34.1,17.5) 34.1,23.068 34.7,23.668 34.7,24 v1(34.7,26.4)
  Bottom Layer w0.2: HDR_B1.16@34.1,15.4 v2(34.1,17.5)
LED6: HDR_B1.18 U4.AC10 | length 13.4
  Top Layer w0.2: v1(34.7,27.4) U4.AC10@35.2,27.9
  MidLayer1 w0.127: v1(34.7,27.4) 35.2,26.9 35.2,23.3 35.2,23 35.2,20.955 35.677,20.478 35.677,19.286 35.2,18.809 35.2,17.8 34.9,17.5 v2(34.9,16.9)
  Bottom Layer w0.2: HDR_B1.18@34.9,15.4 v2(34.9,16.9)
LED7: HDR_B1.20 U4.AC11 | length 13.1
  Top Layer w0.2: v1(35.7,27.4) U4.AC11@36.2,27.9
  MidLayer1 w0.127: v2(35.7,17.5) 35.7,18.7 36.2,19.2 36.2,23 36.2,23.3 36.2,26.9 v1(35.7,27.4)
  Bottom Layer w0.2: HDR_B1.20@35.7,15.4 v2(35.7,17.5)
LED_PGM: LED1.2 U2.4 | length 6.6
  Top Layer w0.2: LED1.2@32.9,4.2 33.05,4.2 36.2,4.2 v1(37.3,3.1)
  Bottom Layer w0.2: U2.4@36.36,2.869 36.462,2.833 36.6,2.785 36.6,2.65 36.6,2.8 U2.4@36.6,3.1 ; U2.4@36.4,3.2 36.45,3.2 36.55,3.1 v1(37.3,3.1)
LED_PWR: LED2.1 R2.2 | length 4.2
  Top Layer w0.4: v1(47.4,4.3) LED2.1@49.4,4.3
  Bottom Layer w0.4: v1(47.4,4.3) R2.2@49.612,4.3
LX: L1.1 U5.1 U5.3 U5.14 U5.16 | length 18.5
  Top Layer w0.4: U5.16@65.852,41.484 v3@67.584,41.484 ; U5.14@65.852,42.754 67.345,42.754 ; 67.4,42.7 67.345,42.754 ; v3@67.8,42.6 67.645,42.754 67.345,42.754 ; 69.8,41.7 70.015,41.484 U5.1@71.744,41.484 ; U5.3@71.744,42.754 69.954,42.754 ; v3@67.584,41.484 67.8,41.7 v3@67.584,41.484 ; 69.954,42.754 69.8,42.6 69.954,42.754
  Bottom Layer w2: 60.5,49.4 v3@67.4,42.5
  other v3: 67.6,41.7 68.35,41.7 69.101,41.7 67.6,42.4 68.35,42.4 69.101,42.4 67.6,43.1 68.35,43.1 69.101,43.1
M0: R14.2 U4.W15 | length 25.7
  Top Layer w0.2: U4.W15@40.2,31.9 v1(40.7,31.4)
  Bottom Layer w0.127: R14.2@23.038,22.4 35.7,22.4 38.3,25 39,25 40.2,26.2 40.2,29.7 40.4,29.9 41.1,29.9 41.2,30 41.2,30.9 v1(40.7,31.4)
M1: R13.2 U4.Y15 | length 26.5
  Top Layer w0.178: U4.Y15@40.2,30.9 v1(40.7,30.4)
  Bottom Layer w0.127: R13.2@23.038,24.6 25,24.6 26.4,23.2 35.6,23.2 38.9,26.5 38.9,31.3 39.5,31.9 40,31.9 40.2,31.7 40.2,30.9 v1(40.7,30.4)
M2: R11.2 U4.W14 | length 23.9
  Top Layer w0.2: U4.W14@39.2,31.9 v1(39.7,31.4)
  Bottom Layer w0.127: R11.2@23.038,23.538 R11.2@23.038,23.5 25.6,23.5 26.2,22.9 35.8,22.9 38.3,25.4 39.2,26.3 39.2,27.153 39.2,30.9 v1(39.7,31.4)
MOUSECLOCK: HDR_T1.30 U4.A18 | length 21
  Top Layer w0.127: v2(39.7,67.7) 39.7,62.9 41.65,60.949 43.4,59.2 43.4,57.7 43.1,57.4 43.1,52.6 43.2,52.5 43.2,51.8 43.2,51.5 U4.A18@43.2,49.9
  Bottom Layer w0.2: HDR_T1.30@39.7,66.2 v2(39.7,67.7)
MOUSEDATA: HDR_T1.32 U4.B18 | length 23.8
  Top Layer w0.127: v2(40.5,68.3) 40.5,62.7 41.147,62.053 44,59.2 44,57.7 44.3,57.4 44.3,57.1 43.4,56.2 43.4,52.7 43.7,52.4 43.7,51.8 43.7,51.5 43.7,49.4 U4.B18@43.2,48.9
  Bottom Layer w0.2: HDR_T1.32@40.5,66.2 v2(40.5,68.3)
NetC90_1: C90.1 U6.6 | length 2.9
  Bottom Layer w0.203: C90.1@34.4,73.3 34.4,74.85 34.625,75.075 U6.6@35.625,75.075
NetLED1_1: LED1.1 R1.2 | length 2.2
  Top Layer w0.2: v1(30,4.3) LED1.1@31.05,4.3
  Bottom Layer w0.2: v1(30,4.3) R1.2@31.162,4.3
NetR25_2: R25.2 R26.1 | length 1.5
  Top Layer w0.35: R25.2@73.938,47.4 R26.1@75.462,47.4
NetRN1_8: RN1.8 RN4.5 | length 2.3
  Bottom Layer w0.127: RN1.8@42.89,83.1 45.2,83.1 RN4.5@45.21,83.1
NetRN2_8: RN2.8 RN6.5 | length 2.3
  Bottom Layer w0.127: RN2.8@35.39,83.1 RN6.5@37.675,83.1 RN6.5@37.71,83.1
NEXUS_TCK: HDR_T1.82 U4.A12 | length 73.6
  Top Layer w0.127: v1(36.703,51.191) 36.909,51.191 37.2,50.9 U4.A12@37.2,49.9
  MidLayer3 w0.127: v1(36.703,51.191) 38.438,49.456 38.438,45.73 39.271,44.897 46.022,44.897 46.2,44.719 46.2,38.006 47.2,37.006 47.2,34.095 47.395,33.9 52.8,33.9 53.1,33.9 55,33.9 56.1,35 56.1,38.7 58.1,40.7 58.1,51.5 61.8,55.2 61.8,57.5 61.6,57.7 61.6,60.5 60.5,61.6 v2(60.5,67.7)
  Bottom Layer w0.2: HDR_T1.82@60.5,66.2 v2(60.5,67.7)
NEXUS_TDI: HDR_T1.84 U4.U21 | length 50.2
  Top Layer w0.2: U4.U21@46.2,33.9 v1(46.7,33.4)
  MidLayer3 w0.127: v1(46.7,33.4) 47.2,32.9 52.8,32.9 53.1,32.9 54.7,32.9 56.4,34.6 56.4,38.6 58.4,40.6 58.4,51.4 62.1,55.1 62.1,57.2 62.6,57.7 62.6,60.4 61.3,61.7 v2(61.3,68.3)
  Bottom Layer w0.2: HDR_T1.84@61.3,66.2 v2(61.3,68.3)
NEXUS_TDO: HDR_T1.76 U4.B24 | length 25.2
  Top Layer w0.127: U4.B24@49.2,48.9 49.7,49.4 49.7,50.2 50.3,50.8 50.3,54.5 52.7,56.9 52.7,57.4 58.1,62.8 58.1,67.6 v2(58.1,68.3)
  Bottom Layer w0.2: HDR_T1.76@58.1,66.2 v2(58.1,68.3)
NEXUS_TMS: HDR_T1.80 U4.T24 | length 44.4
  Top Layer w0.2: U4.T24@49.2,34.9 v1(49.7,34.4)
  MidLayer3 w0.127: v1(49.7,34.4) 50,34.4 50.5,34.9 52.8,34.9 53.1,34.9 54.5,34.9 55.8,36.2 55.8,38.8 57.8,40.8 57.8,51.6 60.8,54.6 60.8,57.5 61,57.7 61,60.1 59.7,61.4 v2(59.7,68.3)
  Bottom Layer w0.2: HDR_T1.80@59.7,66.2 v2(59.7,68.3)
NFAULT: R28.2 U6.8 | length 2.6
  Bottom Layer w0.203: U6.8@35.6,76.375 35.6,77 36.2,77.6 R28.2@37.362,77.6
ONE_WIRE.PIO2: U1.6
ONE_WIRE_DB_PB: HDR_B1.79 U4.AA8 | length 49.5
  Top Layer w0.2: v1(32.7,29.4) U4.AA8@33.2,29.9
  MidLayer3 w0.127: v1(32.7,29.4) 32.2,28.9 32.2,23.3 32.2,23 32.2,22.6 31.8,22.2 31.8,17.5 32.2,17.1 32.2,15.8 39.7,8.3 59.3,8.3 59.7,7.9 v2(59.7,6.3)
  Bottom Layer w0.2: v2(59.7,6.3) HDR_B1.79@59.7,8.6
ONE_WIRE_DBID: HDR_T1.92 U1.2 | length 9.2
  Bottom Layer w0.127: HDR_T1.92@64.5,66.2 64.5,68.046 63.8,68.746 63.8,71.6 64.5,72.3 U1.2@66.995,72.3
ONE_WIRE_PIO1: HDR_T1.91 U1.3 | length 26.5
  Top Layer w0.2: v2(64.5,57.3) v2@64.5,57.4
  Top Layer w0.35: v2(64.5,57.3) v2@64.562,57.238
  MidLayer4 w0.203: v2(64.5,57.3) 64.5,59.5 63.9,60.1 63.9,71.1 65.1,72.3 v2(68.8,72.3)
  Bottom Layer w0.127: v2@64.5,57.4 HDR_T1.91@64.5,59.4
  Bottom Layer w0.2: v2(64.5,57.3) 64.5,57.4 HDR_T1.91@64.5,59.4
  Bottom Layer w0.203: U1.3@66.995,73.57 68.33,73.57 68.8,73.1 v2(68.8,72.3)
PROG_B: R15.2 U4.H15 | length 36.8
  Top Layer w0.2: U4.H15@40.2,42.9 v1(40.7,43.4)
  MidLayer4 w0.127: v1(40.2,54.3) 41.2,53.3 41.2,43.9 v1(40.7,43.4)
  Bottom Layer w0.127: R15.2@21.462,53.2 21.5,53.162 v1(21.5,52.4) 22.9,52.4 23.2,52.7 23.2,53.3 23.8,53.9 24.8,53.9 25,53.7 25,52.7 25.2,52.5 26.6,52.5 27.7,53.6 27.7,55.065 27.989,55.354 28.845,55.354 29.435,54.765 37.505,54.765 38.073,55.333 39.167,55.333 v1(40.2,54.3)
REF_1V2: C87.2 U5.10 | length 2.2
  Top Layer w0.4: C87.2@63.65,45.3 63.655,45.294 U5.10@65.852,45.294
REF_CLK: HDR_B1.4 U4.AE10 | length 25.7
  Top Layer w0.127: v1(35.024,19.788) 35.024,20.382 34.7,20.706 34.7,23 34.7,23.3 34.7,25.4 U4.AE10@35.2,25.9
  MidLayer1 w0.127: v2(29.3,17.5) 29.3,16.9 29.9,16.3 38.4,16.3 39.4,17.3 39.4,18 v1(38.7,18.7)
  MidLayer4 w0.127: v1(35.024,19.788) 36.112,18.7 v1(38.7,18.7)
  Bottom Layer w0.2: HDR_B1.4@29.3,15.4 v2(29.3,17.5)
RS232_CTS: HDR_T1.22 U4.B14 | length 23.7
  Top Layer w0.127: v2(36.5,67.7) 36.5,62.8 40.2,59.1 40.2,57.7 39.9,57.4 39.9,56.918 38.209,55.227 38.209,54.298 v1(38.76,53.746) ; v1(39.04,52.045) 39.455,52.045 39.7,51.8 39.7,51.5 39.7,49.4 U4.B14@39.2,48.9
  MidLayer1 w0.127: v1(38.76,53.746) 38.76,52.847 39.04,52.568 v1(39.04,52.045)
  Bottom Layer w0.2: HDR_T1.22@36.5,66.2 v2(36.5,67.7)
RS232_RTS: HDR_T1.18 U4.B13 | length 22.4
  Top Layer w0.127: v2(34.9,67.7) 34.9,62.8 38.6,59.1 38.6,57.7 38.3,57.4 38.3,57.2 37.7,56.6 37.7,51.8 37.7,51.5 37.7,49.4 U4.B13@38.2,48.9
  Bottom Layer w0.2: HDR_T1.18@34.9,66.2 v2(34.9,67.7)
RS232_RX: HDR_T1.24 U4.A16 | length 22.5
  Top Layer w0.127: v2(37.3,68.3) 37.3,62.6 40.8,59.1 40.8,57.7 41.3,57.2 41.3,53 40.8,52.5 40.8,51.8 40.8,51.5 40.8,50.7 41.2,50.3 U4.A16@41.2,49.9
  Bottom Layer w0.2: HDR_T1.24@37.3,66.2 v2(37.3,68.3)
RS232_TX: HDR_T1.20 U4.A15 | length 24.2
  Top Layer w0.127: v2(35.7,68.3) 35.7,62.6 39.2,59.1 39.2,57.7 39.5,57.4 39.5,57 37.955,55.455 37.955,53.51 38.811,52.654 39.695,52.654 40,52.349 40,51.8 40,51.5 40,50.5 40.2,50.3 U4.A15@40.2,49.9
  Bottom Layer w0.2: HDR_T1.20@35.7,66.2 v2(35.7,68.3)
SCL: HDR_B1.5 U4.AA7 | length 25.4
  Top Layer w0.2: v1(31.7,29.4) U4.AA7@32.2,29.9
  MidLayer3 w0.127: v2(30.1,7.1) 30.1,16.1 30.6,16.6 30.6,17.1 30.3,17.4 30.3,23 30.3,23.3 30.3,25.2 31.2,26.1 31.2,28.9 v1(31.7,29.4)
  Bottom Layer w0.2: v2(30.1,7.1) HDR_B1.5@30.1,8.6
SDA: HDR_B1.3 U4.AA3 | length 30
  Top Layer w0.2: v1(27.7,29.4) U4.AA3@28.2,29.9
  MidLayer1 w0.127: v1(27.7,29.4) 27.5,29.4 27,28.9 25.5,28.9 23.3,26.7 23.3,16.041 27.095,12.246 27.354,12.246 29.3,10.3 v2(29.3,7.1)
  Bottom Layer w0.2: v2(29.3,7.1) HDR_B1.3@29.3,8.6
SLEEP_N: HDR_T1.93
SPI_CLK: HDR_T1.46 U4.D12 | length 27.9
  Top Layer w0.2: v1(36.7,47.4) U4.D12@37.2,46.9
  MidLayer2 w0.127: v1(36.7,47.4) 37.2,47.9 37.2,48.605 38.176,49.581 39.458,49.581 40.157,50.28 40.157,53.057 42.7,55.6 43.5,55.6 44.2,56.3 44.2,57.5 43.9,57.8 43.9,58.3 46.1,60.5 v2(46.1,67.7)
  Bottom Layer w0.2: HDR_T1.46@46.1,66.2 v2(46.1,67.7)
SPI_DIN: HDR_T1.44 U4.C11 | length 27.5
  Top Layer w0.2: v1(35.7,48.4) U4.C11@36.2,47.9
  MidLayer2 w0.127: v1(35.7,48.4) 36.2,48.9 36.2,51.5 36.2,51.8 36.2,53.3 39.2,56.3 39.6,56.7 40.8,56.7 41.9,57.8 41.9,58.9 43.3,60.3 43.3,66.3 v2(45.3,68.3)
  Bottom Layer w0.2: HDR_T1.44@45.3,66.2 v2(45.3,68.3)
  Bottom Layer w0.381: v1(35.7,48.4) v1@35.808,48.4
SPI_DOUT: HDR_T1.50 U4.G10 | length 33.3
  Top Layer w0.2: v1(34.7,44.4) U4.G10@35.2,43.9
  MidLayer2 w0.127: v1(34.7,44.4) 35.3,44.4 35.8,44.9 38.1,44.9 38.5,45.3 38.5,47.904 40.7,50.104 40.7,52.7 43,55 44,55 45.8,56.8 45.8,57.5 45.6,57.7 45.6,58.2 47.7,60.3 v2(47.7,67.7)
  Bottom Layer w0.2: HDR_T1.50@47.7,66.2 v2(47.7,67.7)
SPI_MODE: HDR_T1.52 U4.E14 | length 29
  Top Layer w0.2: U4.E14@39.2,45.9 v1(39.7,46.4)
  MidLayer2 w0.127: v1(39.7,46.4) 40.2,46.9 40.2,48.793 41.2,49.793 41.2,51.5 41.2,51.8 41.2,52.8 43.1,54.7 44.2,54.7 44.5,55 45.4,55.9 46.3,56.8 46.3,57.4 48.5,59.6 v2(48.5,68.3)
  Bottom Layer w0.2: HDR_T1.52@48.5,66.2 v2(48.5,68.3)
SPI_SEL: HDR_T1.48 U4.E13 | length 29
  Top Layer w0.2: v1(37.7,46.4) U4.E13@38.2,45.9
  MidLayer2 w0.127: v1(37.7,46.4) 38.2,46.9 38.2,47.964 40.446,50.21 40.446,52.846 42.2,54.6 42.9,55.3 43.7,55.3 44.8,56.4 44.8,57.5 45.1,57.8 45.1,58.1 46.9,59.9 v2(46.9,68.3)
  Bottom Layer w0.2: HDR_T1.48@46.9,66.2 v2(46.9,68.3)
SRAM1_A0: U4.V22 U10.1 | length 26.5
  Top Layer w0.2: U4.V22@47.2,32.9 v1(47.7,32.4)
  MidLayer2 w0.127: v1(47.7,32.4) 48.2,31.9 52.8,31.9 53.1,31.9 53.9,31.9 56.1,29.7 56.1,25.4 63,18.5 v1(64.1,18.5)
  Bottom Layer w0.127: U10.1@62.952,18.5 v1(64.1,18.5)
SRAM1_A1: U4.U22 U10.2 | length 28.6
  Top Layer w0.2: U4.U22@47.2,33.9 v1(47.7,33.4)
  MidLayer2 w0.127: v1(47.7,33.4) 48.2,32.9 52.8,32.9 53.1,32.9 55.9,32.9 56.7,32.1 56.7,26.4 63.8,19.3 v1(64.7,19.3)
  Bottom Layer w0.127: U10.2@62.952,19.3 v1(64.7,19.3)
SRAM1_A2: U4.P23 U10.3 | length 29.5
  Top Layer w0.2: U4.P23@48.2,36.9 v1(48.7,36.4)
  MidLayer1 w0.127: v1(48.7,36.4) 48.2,35.9 48.2,27 48.3,26.9 48.9,26.9 49.2,26.6 49.2,25.8 50.1,24.9 51.2,24.9 51.7,24.4 52.8,24.4 53.1,24.4 53.8,24.4 54,24.2 54,23.5 53.8,23.3 v1(53.8,22.8)
  Bottom Layer w0.127: v1(53.8,22.8) 56.5,20.1 U10.3@62.952,20.1
SRAM1_A3: U4.Y17 U10.4 | length 33.5
  Top Layer w0.2: U4.Y17@42.2,30.9 v1(42.7,30.4)
  MidLayer4 w0.127: v1(42.7,30.4) 43.2,29.9 43.2,23.3 43.2,23 43.2,22.3 45.4,20.1 48.705,20.1 49.505,20.9 v1(64.7,20.9)
  Bottom Layer w0.127: U10.4@62.952,20.9 v1(64.7,20.9)
SRAM1_A4: U4.Y18 U10.5 | length 31.6
  Top Layer w0.2: U4.Y18@43.2,30.9 v1(43.7,30.4)
  MidLayer4 w0.127: v1(43.7,30.4) 44.2,29.9 44.2,23.3 44.2,23 44.2,22 45.846,20.354 48.209,20.354 49.555,21.7 v1(64.1,21.7)
  Bottom Layer w0.127: U10.5@62.952,21.7 v1(64.1,21.7)
SRAM1_A5: U4.V20 U10.18 | length 20.9
  Top Layer w0.2: U4.V20@45.2,32.9 v1(45.7,32.4)
  MidLayer4 w0.127: v1(45.7,32.4) 46.2,31.9 52.8,31.9 53.1,31.9 53.8,31.9 54.1,31.6 61.5,31.6 62,32.1 v1(64.105,32.1)
  Bottom Layer w0.127: U10.18@62.952,32.1 v1(64.105,32.1) v1@64.205,32.1
SRAM1_A6: U4.U20 U10.19 | length 21.8
  Top Layer w0.2: U4.U20@45.2,33.9 v1(45.7,33.4)
  MidLayer4 w0.127: v1(45.7,33.4) 46.2,32.9 52.8,32.9 53.1,32.9 53.8,32.9 v1(64.7,32.9)
  Bottom Layer w0.127: U10.19@62.952,32.9 v1(64.7,32.9) v1@64.8,32.9
SRAM1_A7: U4.T20 U10.20 | length 20.7
  Top Layer w0.2: U4.T20@45.2,34.9 v1(45.7,34.4)
  MidLayer4 w0.127: v1(45.7,34.4) 46.1,33.9 50,33.9 52.8,33.9 53.1,33.9 54.5,33.9 54.7,33.7 62.4,33.7 v1(64.105,33.7)
  Bottom Layer w0.127: U10.20@62.952,33.7 v1(64.105,33.7) v1@64.205,33.7
SRAM1_A8: U4.R20 U10.21 | length 22.1
  Top Layer w0.2: U4.R20@45.2,35.9 v1(45.7,35.4)
  MidLayer4 w0.127: v1(45.7,35.4) 46.2,34.9 52.8,34.9 53.1,34.9 56,34.9 56.4,34.5 v1(64.7,34.5)
  Bottom Layer w0.127: U10.21@62.8,34.5 U10.21@62.952,34.5 v1(64.7,34.5) v1@64.8,34.5
SRAM1_A9: U4.P20 U10.22 | length 20.7
  Top Layer w0.2: U4.P20@45.2,36.9 v1(45.7,36.4)
  MidLayer4 w0.127: v1@45.75,36.4 46.2,35.9 52.8,35.9 53.1,35.9 55.9,35.9 56.5,35.3 v1(64.105,35.3)
  Bottom Layer w0.127: U10.22@62.952,35.3 v1(64.105,35.3)
SRAM1_A10: U4.V21 U10.23 | length 31.3
  Top Layer w0.2: U4.V21@46.2,32.9 v1(46.7,32.4)
  MidLayer3 w0.127: v1(46.7,32.4) 47.2,31.9 52.8,31.9 53.1,31.9 53.7,31.9 54.3,31.3 57.8,31.3 61.8,35.3 63.405,35.3 63.905,35.8 64.305,35.8 64.805,35.3 ; 64.8,35.3 64.805,35.3 ; v1(73.2,35.3) 71.5,35.3 71,35.8 70.6,35.8 70.1,35.3 64.805,35.3
  Bottom Layer w0.127: v1(73.2,35.3) U10.23@74.352,35.3
SRAM1_A11: U4.W21 U10.24 | length 30.9
  Top Layer w0.2: U4.W21@46.2,31.9 v1(46.7,31.4)
  MidLayer3 w0.127: v1(46.7,31.4) 47.2,30.9 52.8,30.9 53.1,30.9 59.4,30.9 63,34.5 64,34.5 64.5,35 64.9,35 65.4,34.5 69.4,34.5 69.9,35 70.3,35 70.8,34.5 v1(73.2,34.5)
  Bottom Layer w0.127: v1(73.2,34.5) U10.24@74.352,34.5
SRAM1_A12: U4.Y21 U10.25 | length 31
  Top Layer w0.2: U4.Y21@46.2,30.9 v1(46.7,30.4)
  MidLayer3 w0.127: v1(46.7,30.4) 47.2,29.9 52.8,29.9 53.1,29.9 59.2,29.9 63,33.7 63.405,33.7 63.905,34.2 64.305,34.2 64.805,33.7 70.1,33.7 70.6,34.2 71,34.2 71.5,33.7 v1(73.2,33.7)
  Bottom Layer w0.127: v1(73.2,33.7) U10.25@74.352,33.7
SRAM1_A13: U4.AA20 U10.26 | length 46.6
  Top Layer w0.2: U4.AA20@45.2,29.9 v1(45.7,29.4)
  MidLayer3 w0.127: v1(45.7,29.4) 46.2,28.9 46.2,23.3 46.2,23 46.2,20.1 46.5,19.8 53,19.8 58.9,25.7 58.9,28.8 63,32.9 64,32.9 64.5,33.4 64.9,33.4 65.4,32.9 69.4,32.9 69.9,33.4 70.3,33.4 70.8,32.9 v1(73.2,32.9)
  Bottom Layer w0.127: v1(73.2,32.9) U10.26@74.352,32.9
SRAM1_A14: U4.AA19 U10.27 | length 47.1
  Top Layer w0.2: U4.AA19@44.2,29.9 v1(44.7,29.4)
  MidLayer3 w0.127: v1(44.7,29.4) 45.2,28.9 45.2,23.3 45.2,23 45.2,20.6 46.3,19.5 53.2,19.5 60.1,26.4 60.1,29.3 62.9,32.1 63.405,32.1 63.905,32.6 64.305,32.6 64.805,32.1 70.1,32.1 70.6,32.6 71,32.6 71.5,32.1 v1(73.2,32.1)
  Bottom Layer w0.127: v1(73.2,32.1) U10.27@74.352,32.1
SRAM1_A15: U4.AC21 U10.42 | length 34.5
  Top Layer w0.2: U4.AC21@46.2,27.9 v1(46.7,27.4)
  MidLayer1 w0.127: v1(46.7,27.4) 47.2,26.9 47.2,26.1 46.8,25.7 46.8,23.3 46.8,23 46.8,22.6 48.7,20.7 64.2,20.7 64.8,20.1 v1(73.2,20.1)
  Bottom Layer w0.127: v1(73.2,20.1) U10.42@74.352,20.1